# Altium PCB Acoustics Board.PcbDoc (part 3 of 3)
Units mil, origin at the board's own origin, x right, y up, seen from the top; angles counter-clockwise.
Board outline 4000 x 4000 mil, 4 copper layers (Top Layer, Middle 1 Layer, Middle 2 Layer, Bottom Layer), stack 53.912 mil thick; 197 components, 130 nets, 610 pads, 658 vias.
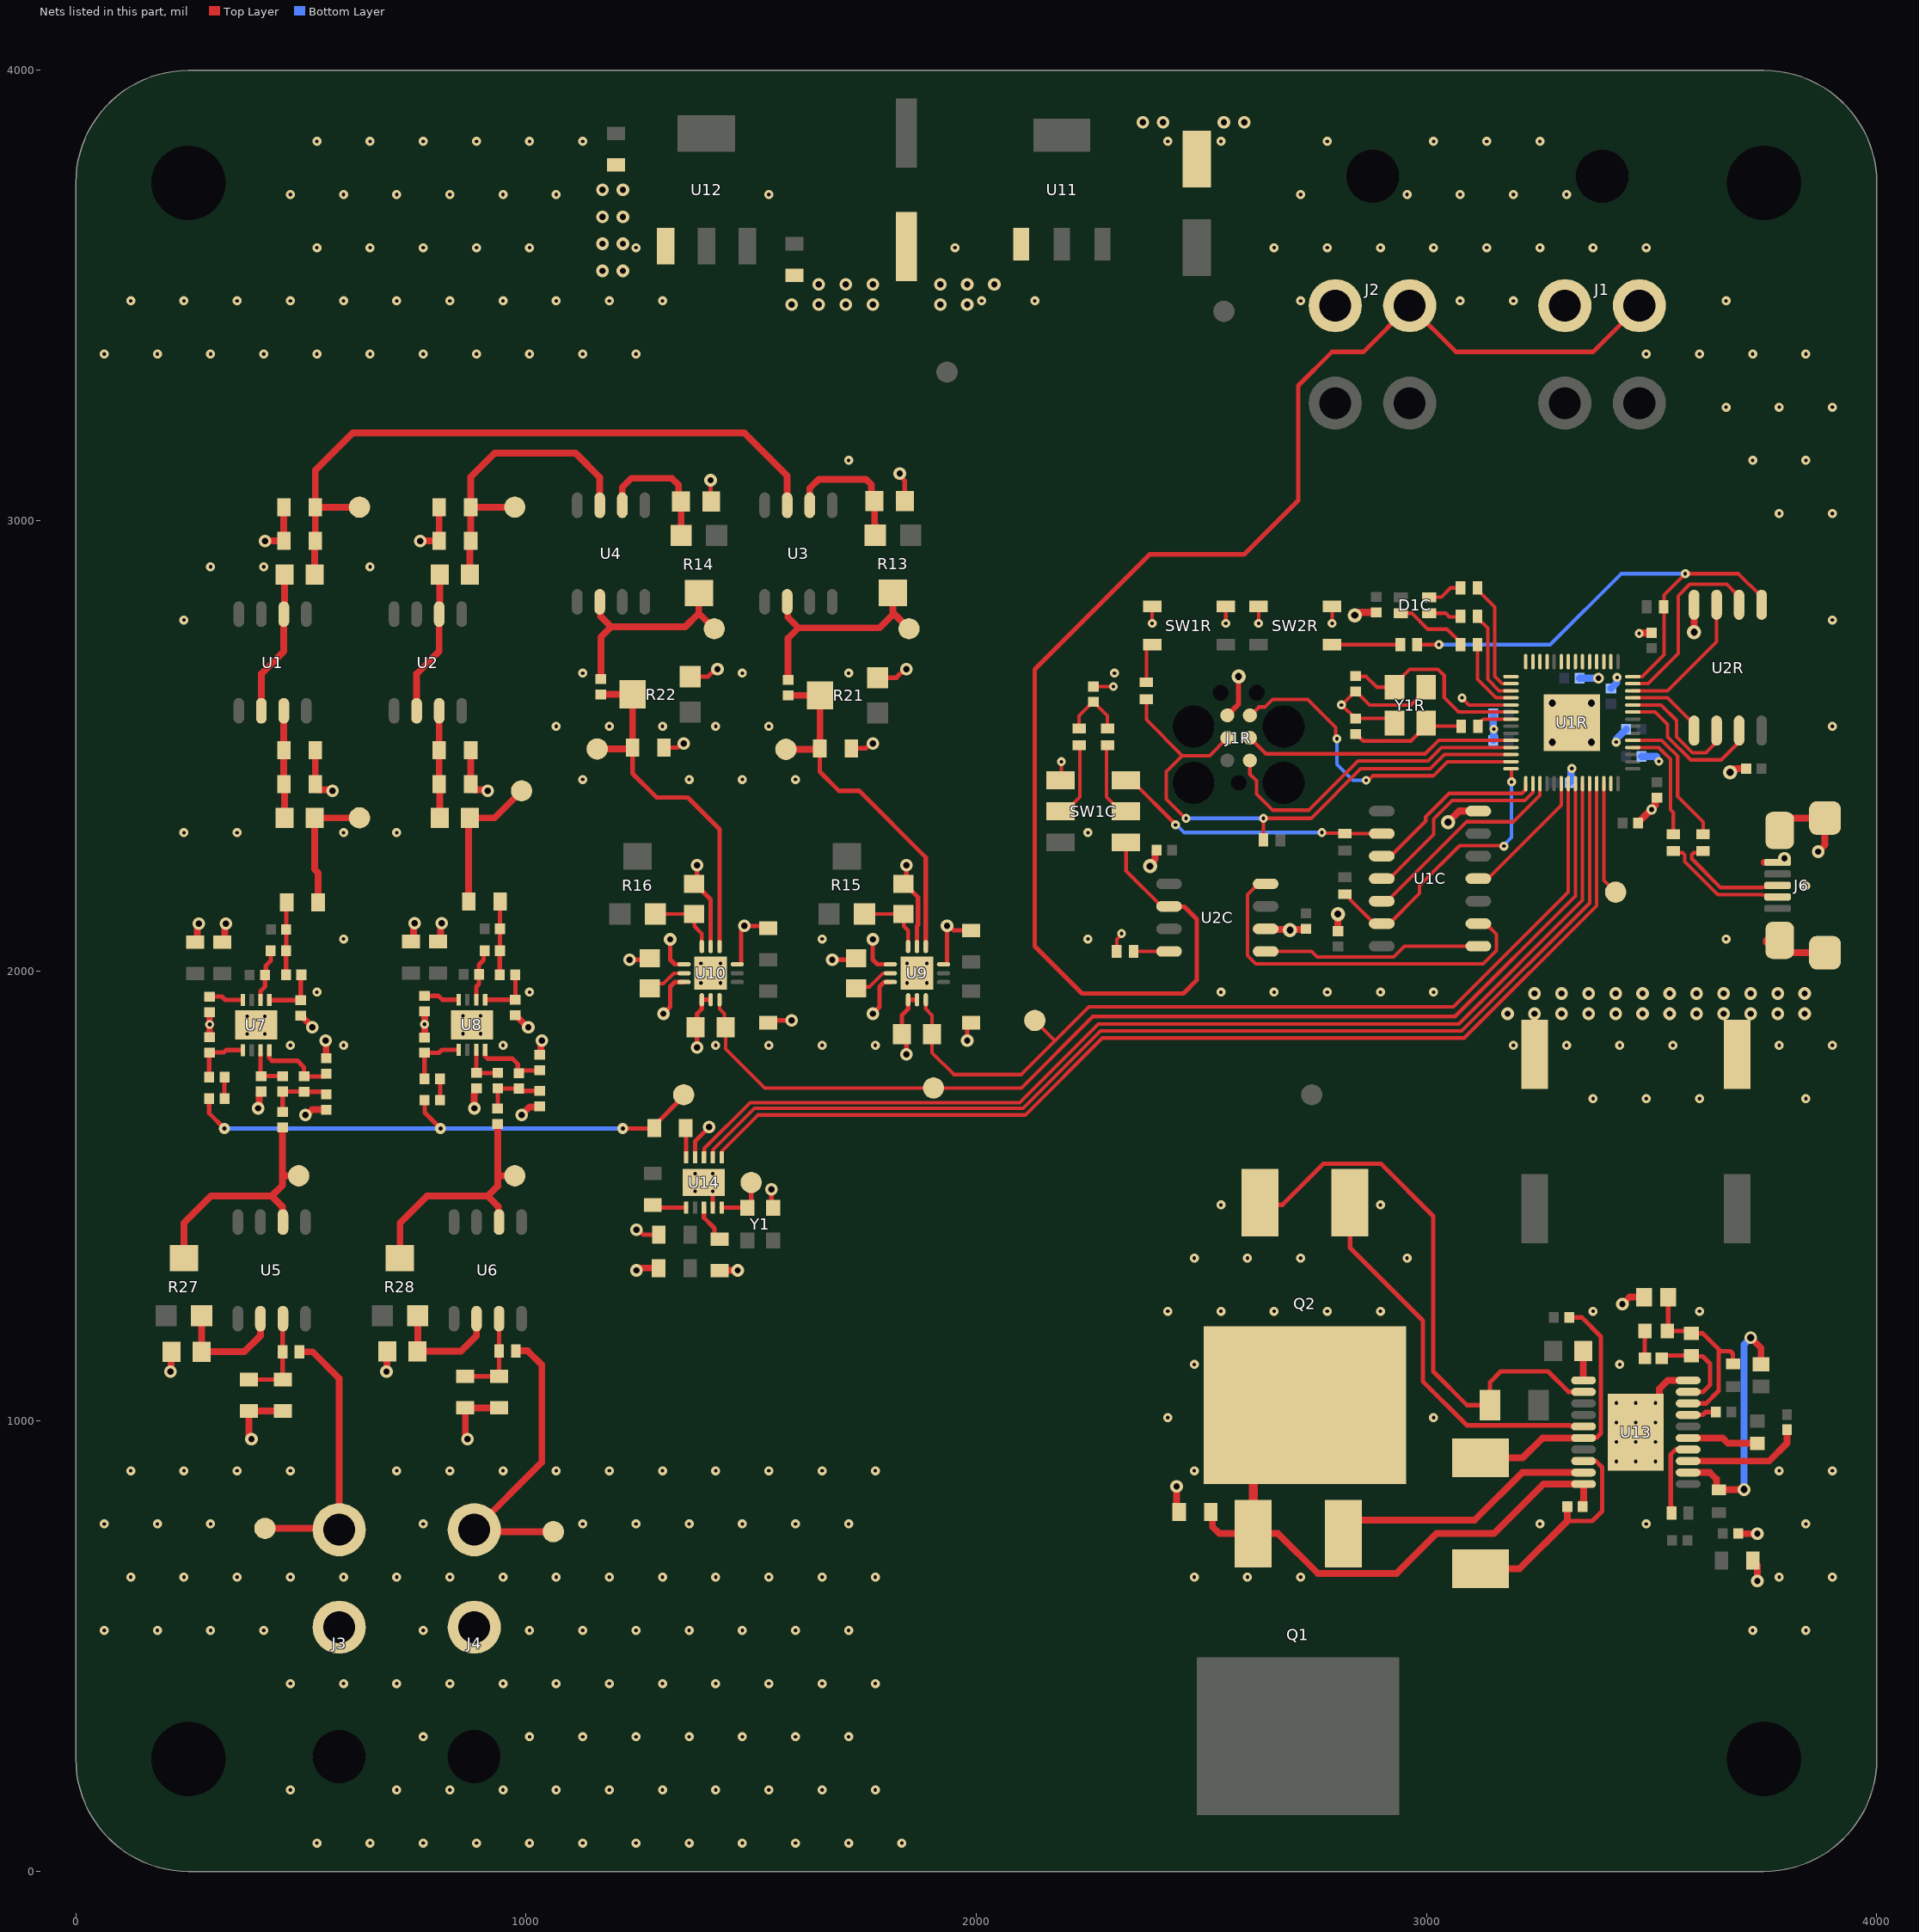
[diagram p4: the nets of this part, all layers, seen from the top]

## Via types
v1: diameter 28, hole 14, Top Layer to Bottom Layer, tented both sides, 299 vias
v2: diameter 20.08/20.08/20.08/20.08 (per signal layer), hole 8.07, Top Layer to Bottom Layer, tented both sides, 256 vias
v3: diameter 19.68, hole 7.87, Top Layer to Bottom Layer, tented both sides, 71 vias
v4: diameter 31.5, hole 15.75, Top Layer to Bottom Layer, tented both sides, 19 vias
v5: diameter 28, hole 16, Top Layer to Bottom Layer, tented both sides, 6 vias
v6: diameter 24, hole 10, Top Layer to Bottom Layer, tented both sides, 3 vias
v7: diameter 20, hole 9, Top Layer to Bottom Layer, tented both sides, 2 vias
v8: diameter 23.62, hole 11.81, Top Layer to Bottom Layer, tented both sides, 2 vias

## Nets (pads, with @x,y where several pads share a name; then routed paths per layer and width w, separated by ;. In a path a pad name is that pad's centre, name@x,y a point inside that pad or via, vN(x,y) a via of type N, cw(c..) or ccw(c..) an arc to the next point about the centre after c; other vN are vias at no path point) (continued)
CANL_RP2CAN: J1.2 J2.2 SW1C.1 U2C.6 | length 3354.6
  Top Layer w7.87: SW1C.1@2320.87,2285.71 SW1C.1@2332.68,2285.71
  Top Layer w8: SW1C.1@2332.68,2285.71 2332.68,2222.13 2411.42,2143.39 U2C.6@2428.15,2143.39
  Top Layer w10: U2C.6@2428.15,2143.39 2428.74,2142.79 2462.21,2142.79 2490,2115 2490,1980 2460,1950 2235,1950 2130,2055 2130,2670 2385,2925 2595,2925 2715,3045 2715,3300 2790,3375 2860.08,3375 J2.2@2962.68,3477.6 3065.28,3375 3370.08,3375 J1.2@3472.68,3477.6
CANRX_RP2CAN: U1C.2 U2C.4 | length 845.6
  Top Layer w7.87: U2C.4@2642.72,2193.39 2625.98,2193.39 2602.36,2169.76 2602.36,2033.6 2620.53,2015.43 3125.73,2015.43 3155.51,2045.22 3155.51,2081.38 3131.89,2105 U1C.2@3115.16,2105
CANTX_RP2CAN: U1C.1 U2C.1 | length 487.4
  Top Layer w7.87: U2C.1@2642.72,2043.39 2745.06,2043.39 2757.26,2031.18 2926.91,2031.18 2950.73,2055 U1C.1@3115.16,2055
"Comparator L": C27.1 D1.2 R21.2 TP9.TP U9.4 | length 832.2
  Top Layer w10: C27.1@1652.45,2494.38 1652.45,2442.55 1695,2400 1740,2400 1887.88,2252.12 U9.4@1887.88,2054.06
  Top Layer w15: TP9.TP@1575,2490 TP9.TP@1577.19,2492.19 1650.26,2492.19 C27.1@1652.45,2494.38 1652.45,2514.38 1652.91,2514.84 R21.2@1652.91,2612 1623.39,2612 1623.35,2611.96 D1.2@1582,2611.96
"Comparator R": C28.1 D2.2 R22.2 TP11.TP U10.4 | length 835
  Top Layer w10: C28.1@1236.39,2496.02 1236.39,2438.61 1290,2385 1359.47,2385 1429.68,2314.78 U10.4@1429.68,2054.06
  Top Layer w15: TP11.TP@1155,2490 TP11.TP@1158.01,2493.01 1233.38,2493.01 C28.1@1236.39,2496.02 ; D2.2@1166.24,2614.23 1207.03,2614.23 1207.08,2614.28 R22.2@1236.61,2614.28 C28.1@1236.6,2496.24
DBG_TX_RP2040: J1R.5 U1R.27 | length 732.1
  Top Layer w7.87: J1R.5@2607.68,2567.6 2609.17,2567.6 2627.74,2586.16 2640.77,2586.16 2657.64,2603.04 2735.82,2603.04 2798.03,2540.82 2798.03,2518.8 v3(2801.18,2515.65) ; v3(2866.14,2423.5) 2870.75,2423.5 2880.6,2433.35 3015.01,2433.35 3046.51,2464.84 U1R.27@3187.5,2464.84
  Bottom Layer w7.87: v3(2801.18,2515.65) 2801.18,2458.94 2836.61,2423.5 v3(2866.14,2423.5)
"Envelope Detector L": D1.1 R13.2 TP7.TP U3.6 | length 512.6
  Top Layer w15: U3.6@1580,2819.72 1581.27,2818.45 1581.27,2785.73 1605,2762 ; D1.1@1582,2646.21 1582,2739 1605,2762 ; R13.2@1815,2839.91 1815,2792 ; TP7.TP@1850.61,2760 1818.61,2792 1815,2792 ; 1605,2762 1785,2762 1815,2792
"Envelope Detector R": D2.1 R14.2 TP8.TP U4.6 | length 491.8
  Top Layer w15: U4.6@1163.69,2819.72 1165.34,2818.07 1165.34,2787.63 1188.69,2764.28 ; D2.1@1166.24,2648.48 1166.24,2741.83 1188.69,2764.28 ; R14.2@1383.69,2839.28 1383.69,2794.28 ; TP8.TP@1417.98,2760 1383.69,2794.28 ; 1188.69,2764.28 1353.69,2764.28 1383.69,2794.28
FSYNC: U1R.37 U14.8 | length 2458.5
  Top Layer w7.87: U14.8@1395,1585.71 1395.98,1586.69 1395.98,1605.98 1497.44,1707.44 2096.29,1707.44 2271.18,1882.33 3071.72,1882.33 3346.46,2157.06 U1R.37@3346.46,2416.12
GND: C1.2 C1C.2 C1R.2 C2.2 C2C.1 C2R.2 C3.2 C3C.2 C3R.2 C4.2 C4C.2 C4R.2 C5.2 C5C.2 C5R.2 C6.2 C6R.2 C7R.2 C8R.2 C9.1 C9R.2 C10.1 C10R.2 C11R.2 C12R.2 C13.1 C13R.2 C14.1 C15.1 C16.1 C17.1 C18.1 C19.1 C20.1 C21.2 C22.2 C27.2 C28.2 C29.1 C30.1 C31.2 C34.2 C35.2 C36.2 C37.2 C38.2 C39.2 C42.1 C43.1 C51.2 C52.2 C53.2 C54.2 J1.1 J1R.6 J2.1 J3.1 J4.1 J6.5 J6.6 J6.7 J6.8 J6.9 L1.2 L2.2 L3.2 L4.2 L5.2 L6.2 L9.2 L10.2 L11.2 L12.2 L21.1 R6C.2 R9.2 R10.2 R17.2 R18.2 R19.1 R20.1 R21.3 R22.3 R25.2 R26.2 R29.2 R30.2 R31.2 SW1C.6 SW1R.B1 SW1R.B2 SW2R.B1 SW2R.B2 U1C.7 U1R.19 U1R.57 U2C.2 U2R.4 U7.9 U8.9 U9.3 U9.5 U9.7 U9.9 U9.10 U9.11 U9.13 U10.3 U10.5 U10.7 U10.9 U10.10 U10.11 U10.13 U11.1 U12.1 U13.10 U13.21 U14.4 U14.9 U14.11 Y1.2 Y1R.2 Y1R.4 | length 5947.9
  Top Layer w7.87: SW1C.6@2187.01,2423.5 2188.98,2425.47 v3(2188.98,2464.84) ; C2C.1@2259.84,2631.57 v3(2304.44,2631.57) ; R6C.2@2312.01,2043.39 2312.01,2069.96 2322.83,2080.79 v3(2322.83,2082.95) ; v3(2390.75,2771.93) SW1R.B2@2390.75,2809.33 ; v3(2554.13,2771.93) 2554.13,2805.47 SW1R.B1@2554.25,2805.59 ; v3(2626.97,2771.93) SW2R.B2@2626.97,2809.33 ; v3(2790.35,2771.93) SW2R.B1@2790.35,2809.33 ; v3(3078.74,2606.57) 3094.49,2590.83 U1R.19@3187.5,2590.83 ; U1R.57@3275.59,2590.83 v4(3279.53,2594.76)
  Top Layer w8: SW1R.B1@2551.57,2808.27 SW1R.B1@2554.25,2805.59 ; v3(2811.02,2590.83) v3@2811.61,2590.83 ; Y1R.2@2929.13,2550.2 2918.62,2560.71 C2R.2@2842.52,2560.71 2841.73,2560.71 v3@2811.61,2590.83 ; Y1R.4@2999.13,2630.2 2999.13,2624.29 2965.61,2590.76 2873.49,2590.76 2843.31,2620.94 C1R.2@2842.52,2620.94 2841.73,2620.94 v3@2811.61,2590.83
  Top Layer w10: v1(1230,2025) 1271.5,2025 R20.1@1275,2028.5 ; v1(1245,1425) 1249.87,1425 1260.58,1414.29 C31.2@1294.68,1414.29 ; v1(1305,1905) 1320,1920 1320,1965 1330.32,1975.32 U10.9@1350.94,1975.32 ; C28.2@1306.39,2496.02 1336.14,2496.02 1345.13,2505 v1(1350,2505) ; v1(1320,2070) 1320,2025 1330.31,2014.69 U10.7@1350.94,2014.69 ; R22.3@1364.56,2653.65 1403.78,2653.65 1420.13,2670 v1(1425,2670) ; U14.9@1375.31,1585.71 1375.31,1621.82 v1(1406.75,1653.25) ; v1(1380,1830) 1380,1871.5 R18.2@1376.5,1875 1379.81,1878.31 1379.81,1904.81 1390.31,1915.31 U10.10@1390.31,1935.94 U10.11@1410,1935.94 ; v1(1380,2235) 1380,2200.3 R30.2@1373.2,2193.5 1375.7,2193.5 1410,2159.2 U10.5@1410,2054.06 ; v1(1410,3090) 1410,3043.98 R10.2@1411.35,3042.63 ; U14.4@1414.68,1474.29 v3(1414.68,1510.31) ; U10.3@1469.06,2014.69 1477.83,2014.69 1477.91,2014.76 1477.91,2088.04 1485,2095.13 v1(1485,2100) 1533.2,2100 C52.2@1538.2,2095 ; C54.2@1538.2,1885 1543.2,1890 v1(1590,1890) ; v1(1545,1515) 1545,1477.53 Y1.2@1548.34,1474.2 ; v1(1680,2025) 1729.7,2025 R19.1@1733.2,2028.5 ; C27.2@1722.45,2494.38 1754.51,2494.38 1765.13,2505 v1(1770,2505) ; v1(1770,1905) 1785,1920 1785,1965 1795.32,1975.32 U9.9@1809.14,1975.32 ; v1(1770,2070) 1770,2025 1780.31,2014.69 U9.7@1809.14,2014.69 ; R21.3@1780.87,2651.37 1822.62,2651.37 1841.25,2670 v1(1845,2670) ; v1(1830,3105) 1830,3100.13 1841.03,3089.1 R9.2@1841.03,3043.49 ; v1(1845,1815) 1845,1849.7 R17.2@1834.7,1860 1834.7,1901.5 1848.51,1915.31 U9.10@1848.51,1935.94 U9.11@1868.2,1935.94 ; v1(1845,2235) 1845,2200.3 R29.2@1838.2,2193.5 1840.7,2193.5 1870.7,2163.5 1870.7,2102.36 1868.2,2099.86 U9.5@1868.2,2054.06 ; U9.3@1927.25,2014.69 1934.92,2014.69 1935,2014.76 v1(1935,2100) 1939.87,2100 1949.87,2090 C51.2@1988.2,2090 ; v1(1980,1845) 1980,1876.8 C53.2@1988.2,1885 ; L21.1@2445,804.32 L21.1@2450.74,798.58 ; J6.7@3780,2310 3782.56,2310 J6.7@3784.61,2312.05
  Top Layer w11.81: J1R.6@2557.68,2567.6 2582.59,2592.51 v4(2582.59,2654.14)
  Top Layer w15: v1(210,1110) 211.27,1111.27 211.27,1153.1 R25.2@212.54,1154.37 ; C17.1@264.98,2064.21 269.89,2069.12 269.89,2098.6 272.86,2101.56 v1(272.86,2105.08) ; C13.1@296.69,1852.96 297.07,1853.35 297.07,1880.72 v7(297.46,1881.1) 297.07,1881.49 297.07,1908.32 C15.1@296.69,1908.71 ; C19.1@325.26,2063.98 330.65,2069.36 330.65,2102.36 v1(333.14,2104.85) ; v1(390,960) 390,963.52 384.41,969.11 C5.2@384.41,1022.58 L5.2@459.41,1022.58 ; v1(405,1695) 405,1698.52 407.6,1701.11 407.6,1728.59 411.12,1732.11 C9.1@411.91,1732.11 ; v1(420,2955) L3.2@462,2955 C3.2@462,3030 ; C21.2@499.44,1900.59 500.23,1900.59 525,1875.82 v1(525,1875) ; v1(510,1680) 512.96,1680 524.79,1691.83 L9.2@556.37,1691.83 ; C1.2@532,2490 L1.2@532,2415 532,2410 539.5,2402.5 563.98,2402.5 566.48,2400 v1(570,2400) ; v1(555,1845) 555.69,1844.31 555.69,1806.47 L11.2@556.39,1805.78 ; v1(690,1110) 690.92,1110.92 690.92,1154.41 R26.2@691.83,1155.32 ; C18.1@744.58,2065.26 749.97,2070.65 749.97,2103.64 v1(752.46,2106.13) ; v1(765,2955) L4.2@807,2955 C4.2@807,3030 ; C14.1@774.58,1852.39 v7(774.59,1881.42) C16.1@774.58,1910.26 ; C20.1@804.58,2065.26 809.97,2070.65 809.97,2103.64 v1(812.46,2106.13) ; v1(870,960) 870,963.52 865.04,968.48 C6.2@865.04,1029.62 L6.2@940.04,1029.62 ; L2.2@877,2490 C2.2@877,2415 877,2410 884.5,2402.5 908.98,2402.5 911.48,2400 v1(915,2400) ; v1(885,1695) 885,1726.82 885.35,1727.17 885.35,1735.61 888.87,1739.14 C10.1@889.66,1739.14 ; C22.2@976.2,1901.67 976.98,1901.67 1003.65,1875 v1(1005,1875) ; v1(990,1680) 1007.61,1697.61 1028.7,1697.61 L10.2@1030.48,1699.4 ; L12.2@1030.64,1813.99 1032.82,1816.17 1032.82,1842.82 v1(1035,1845) ; v1(1245,1335) 1248.52,1335 1253.61,1340.09 C29.1@1294.49,1340.09 ; C30.1@1429.68,1334.29 1430.04,1334.65 1469.65,1334.65 v1(1470,1335) ; L21.1@2445,804.32 v1(2445,855) ; v1(3435,1260) 3435.16,1260 3450.67,1275.51 R31.2@3483.39,1275.51 ; U13.21@3508.27,1042.44 v3(3508.27,1040.47) 3517.47,1049.67 3517.47,1072.47 3535.67,1090.67 U13.10@3581.1,1090.67 ; C39.2@3692.09,750.51 3692.34,750.26 3734.74,750.26 v1(3735,750) ; C38.2@3724.96,690.51 3734.96,680.51 3734.96,669.69 3735,669.65 v1(3735,645) ; 3749.69,2241.18 3750.06,2241.56 3783.04,2241.56 3791.48,2250 v1(3795,2250) ; J6.6@3754.61,2067.95 3754.61,2063.76 3777.97,2040.39 J6.9@3855,2040.39 ; J6.7@3807.97,2339.61 J6.8@3885,2339.61 3885,2280 v1(3870,2265)
  Top Layer w15.75: v4(2385.83,2232.56) 2385.83,2236.82 2397.05,2248.04 2397.05,2264.06 2400.2,2267.2 C3C.2@2400.2,2267.99 ; U2C.2@2642.72,2093.39 2644,2092.11 2695.57,2092.11 v4(2696.85,2090.83) 2698.13,2092.11 2731,2092.11 C4C.2@2732.28,2093.39 ; C1C.2@2803.15,2088.27 v4(2803.15,2126.26) ; v4(2840.87,2789.96) 2845.13,2789.96 2851.63,2796.46 C5C.2@2888.11,2796.46 ; v4(3047.77,2330.46) 3072.32,2355 U1C.7@3115.16,2355 ; C10R.2@3469.28,2328.89 3498.93,2358.54 v8(3500,2358.54) 3500,2359.61 3507.87,2367.48 3507.87,2381.57 3511.02,2384.72 C4R.2@3511.81,2384.72 ; v3(3472.44,2749.55) 3473.13,2750.24 3499.31,2750.24 C7R.2@3500,2750.93 ; U2R.4@3594.29,2813.32 3594.39,2813.23 3594.39,2752.34 v4(3594.49,2752.24) ; v4(3674.41,2441.22) 3682.28,2449.09 C3R.2@3707.28,2449.09
  Bottom Layer w15.75: C12R.2@3148.23,2512.09 3148.92,2512.78 3148.92,2536.26 v3(3149.61,2536.95) 3149.61,2538.02 3148.23,2539.39 C8R.2@3148.23,2571.25 ; C9R.2@3317.72,2417.6 3320.87,2420.75 3320.87,2446.55 3322.83,2448.52 v3(3322.83,2449.58) ; C6R.2@3339.96,2649.88 3340.14,2650.06 3381.9,2650.06 v8(3382.08,2650.25) ; C13R.2@3409.45,2627.64 3410.24,2627.64 3422.56,2639.96 3422.56,2651.18 v3(3423.31,2651.93) ; v3(3421.26,2508.15) 3422.01,2508.9 3422.01,2515.46 3439.57,2533.01 3440.35,2533.01 3443.5,2536.16 C5R.2@3443.5,2536.95 ; C11R.2@3477.76,2476.65 3510.75,2476.65 3510.75,2471.78 3516.18,2466.34 v3(3516.18,2465.28)
  other v1: 3180,1905 3240,1905 3300,1905 3360,1905 3420,1905 3480,1905 3540,1905 3600,1905 3660,1905 3720,1905 3780,1905 3840,1905 3240,1950 3300,1950 3360,1950 3420,1950 3480,1950 3540,1950 3600,1950 3660,1950 3720,1950 3780,1950 3840,1950 1590,3480 1650,3480 1710,3480 1770,3480 1920,3480 1980,3480 1650,3525 1710,3525 1770,3525 1920,3525 1980,3525 2040,3525 1170,3555 1215,3555 1170,3615 1215,3615 1170,3675 1215,3675 1170,3735 1215,3735 2370,3885 2415,3885 2550,3885 2595,3885
  other v2: 535.43,62.99 653.54,62.99 771.65,62.99 889.76,62.99 1007.87,62.99 1125.98,62.99 1244.09,62.99 1362.2,62.99 1480.31,62.99 1598.42,62.99 1716.53,62.99 1834.64,62.99 476.38,181.1 712.6,181.1 830.71,181.1 948.82,181.1 1066.93,181.1 1185.04,181.1 1303.15,181.1 1421.26,181.1 1539.37,181.1 1657.48,181.1 1775.59,181.1 771.65,299.21 1007.87,299.21 1125.98,299.21 1244.09,299.21 1362.2,299.21 1480.31,299.21 1598.42,299.21 1716.53,299.21 476.38,417.32 594.49,417.32 712.6,417.32 830.71,417.32 948.82,417.32 1066.93,417.32 1185.04,417.32 1303.15,417.32 1421.26,417.32 1539.37,417.32 1657.48,417.32 1775.59,417.32 62.99,535.43 181.1,535.43 299.21,535.43 417.32,535.43 771.65,535.43 1007.87,535.43 1125.98,535.43 1244.09,535.43 1362.2,535.43 1480.31,535.43 1598.42,535.43 1716.53,535.43 3724.41,535.43 3842.52,535.43 122.05,653.54 240.16,653.54 358.27,653.54 476.38,653.54 594.49,653.54 712.6,653.54 830.71,653.54 948.82,653.54 1066.93,653.54 1185.04,653.54 1303.15,653.54 1421.26,653.54 1539.37,653.54 1657.48,653.54 1775.59,653.54 2484.25,653.54 2602.36,653.54 2720.47,653.54 3783.46,653.54 3901.57,653.54 62.99,771.65 181.1,771.65 299.21,771.65 771.65,771.65 1125.98,771.65 1244.09,771.65 1362.2,771.65 1480.31,771.65 1598.42,771.65 1716.53,771.65 3251.97,771.65 3488.19,771.65 3842.52,771.65 122.05,889.76 240.16,889.76 358.27,889.76 476.38,889.76 712.6,889.76 830.71,889.76 948.82,889.76 1066.93,889.76 1185.04,889.76 1303.15,889.76 1421.26,889.76 1539.37,889.76 1657.48,889.76 1775.59,889.76 2484.25,889.76 3783.46,889.76 3901.57,889.76 2425.2,1007.87 3015.75,1007.87 2484.25,1125.98 3429.13,1125.98 2425.2,1244.09 2543.31,1244.09 2661.42,1244.09 2779.53,1244.09 2897.64,1244.09 3370.08,1244.09 3606.3,1244.09 2484.25,1362.2 2602.36,1362.2 2720.47,1362.2 2956.69,1362.2 2543.31,1480.31 2897.64,1480.31 3370.08,1716.53 3488.19,1716.53 3606.3,1716.53 3842.52,1716.53 476.38,1834.64 594.49,1834.64 948.82,1834.64 1421.26,1834.64 1539.37,1834.64 1657.48,1834.64 1775.59,1834.64 3192.91,1834.64 3311.02,1834.64 3429.13,1834.64 3547.24,1834.64 3783.46,1834.64 3901.57,1834.64 535.43,1952.76 1007.87,1952.76 2543.31,1952.76 2661.42,1952.76 2779.53,1952.76 2897.64,1952.76 3015.75,1952.76 594.49,2070.87 1657.48,2070.87 2248.03,2070.87 3665.35,2070.87 3842.52,2188.98 240.16,2307.09 358.27,2307.09 594.49,2307.09 712.6,2307.09 2248.03,2307.09 1125.98,2425.2 1362.2,2425.2 1480.31,2425.2 1598.42,2425.2 1066.93,2543.31 1185.04,2543.31 1303.15,2543.31 1421.26,2543.31 1539.37,2543.31 3901.57,2543.31 1125.98,2661.42 1480.31,2661.42 1716.53,2661.42 2307.09,2661.42 240.16,2779.53 3901.57,2779.53 299.21,2897.64 417.32,2897.64 653.54,2897.64 3783.46,3015.75 3901.57,3015.75 1716.53,3133.86 3724.41,3133.86 3842.52,3133.86 3665.35,3251.97 3783.46,3251.97 3901.57,3251.97 62.99,3370.08 181.1,3370.08 299.21,3370.08 417.32,3370.08 535.43,3370.08 653.54,3370.08 771.65,3370.08 889.76,3370.08 1007.87,3370.08 1125.98,3370.08 1244.09,3370.08 3488.19,3370.08 3606.3,3370.08 3724.41,3370.08 3842.52,3370.08 122.05,3488.19 240.16,3488.19 358.27,3488.19 476.38,3488.19 594.49,3488.19 712.6,3488.19 830.71,3488.19 948.82,3488.19 1066.93,3488.19 1185.04,3488.19 1303.15,3488.19 2011.81,3488.19 2129.92,3488.19 2720.47,3488.19 3074.8,3488.19 3192.91,3488.19 3665.35,3488.19 535.43,3606.3 653.54,3606.3 771.65,3606.3 889.76,3606.3 1007.87,3606.3 1244.09,3606.3 1952.76,3606.3 2661.42,3606.3 2779.53,3606.3 2897.64,3606.3 3015.75,3606.3 3133.86,3606.3 3251.97,3606.3 3370.08,3606.3 3488.19,3606.3 476.38,3724.41 594.49,3724.41 712.6,3724.41 830.71,3724.41 948.82,3724.41 1066.93,3724.41 1539.37,3724.41 2720.47,3724.41 2956.69,3724.41 3074.8,3724.41 3192.91,3724.41 3311.02,3724.41 535.43,3842.52 653.54,3842.52 771.65,3842.52 889.76,3842.52 1007.87,3842.52 1125.98,3842.52 2425.2,3842.52 2543.31,3842.52 2779.53,3842.52 3015.75,3842.52 3133.86,3842.52 3251.97,3842.52
  other v3: 3421.65,910.55 3464.96,910.55 3508.27,910.55 3421.65,953.86 3464.96,953.86 3508.27,953.86 3421.65,997.17 3464.96,997.17 3508.27,997.17 3421.65,1040.47 3464.96,1040.47 1375.31,1510.31 1375.31,1549.68 1414.68,1549.68 380.63,1860 420,1860 859.9,1860.58 899.27,1860.58 380.63,1899.37 420,1899.37 859.9,1899.95 899.27,1899.95 1388.35,1973.35 1431.65,1973.35 1846.54,1973.35 1889.85,1973.35 1388.35,2016.65 1431.65,2016.65 1846.54,2016.65 1889.85,2016.65
  other v4: 3279.53,2508.15 3366.14,2508.15 3366.14,2594.76
"Hydrophone L": J3.2 R23.2 TP15.TP | length 614.9
  Top Layer w15: TP15.TP@420,761.97 581.97,761.97 J3.2@585,758.94 585,1095 526.1,1153.9 R23.2@496.86,1153.9
"Hydrophone R": J4.2 R24.2 TP17.TP | length 682.4
  Top Layer w15: R24.2@977.37,1156.12 1003.88,1156.12 1035,1125 1035,908.94 J4.2@885,758.94 889.47,754.47 TP17.TP@1060.53,754.47 TP17.TP@1065,750
INT_RP2CAN: U1C.4 U1R.34 | length 297.2
  Top Layer w7.87: U1C.4@3115.16,2205 3136.15,2205 3299.21,2368.06 U1R.34@3299.21,2413.66
LEDB_RP2CAN: R8C.1 U1R.18 | length 168.1
  Top Layer w7.87: R8C.1@3113.19,2724.68 3113.19,2648.03 3154.64,2606.57 U1R.18@3187.5,2606.57
LEDG_RP2CAN: R7C.1 U1R.17 | length 211.6
  Top Layer w7.87: R7C.1@3113.19,2787.68 3113.19,2783.74 3135.83,2761.1 3135.83,2647.66 3161.17,2622.32 U1R.17@3187.5,2622.32
LEDR_RP2CAN: R5C.1 U1R.16 | length 255
  Top Layer w7.87: R5C.1@3113.19,2850.67 3113.19,2846.73 3151.57,2808.35 3151.57,2654.19 3167.69,2638.07 U1R.16@3187.5,2638.07
"Local Oscillator": C33.2 C49.1 C50.1 TP13.TP | length 1214.4
  Top Layer w10: C49.1@295.94,1716.69 295.94,1684.06 v6(330,1650) ; C50.1@774.87,1713.05 774.87,1685.13 v6(810,1650) ; v6(1215,1650) 1283.47,1650 C33.2@1284.67,1651.2 1284.67,1656.2 1350,1721.53 TP13.TP@1350,1725
  Bottom Layer w10: v6(330,1650) v6(810,1650) v6(1215,1650)
MCLK: TP14.TP U14.5 Y1.3 | length 116.3
  Top Layer w10: U14.5@1434.37,1474.29 1475.41,1474.29 1475.5,1474.2 Y1.3@1491.25,1474.2 1500,1482.94 TP14.TP@1500,1530
MISO_RP2CAN: U1C.12 U1R.31 | length 475
  Top Layer w7.87: U1C.12@2900.59,2155 2913.06,2155 3089.44,2331.38 3193.56,2331.38 3251.97,2389.79 U1R.31@3251.97,2416.12
"Mixer L": C7.1 R27.2 TP2.TP U5.6 | length 564.1
  Top Layer w15: R27.2@240,1362.09 240,1440 300,1500 435,1500 ; C7.1@459.16,1652.39 459.16,1545 ; U5.6@460,1442.28 458.73,1443.55 458.73,1476.27 435,1500 ; TP2.TP@495,1545 459.16,1545 ; 435,1500 459.16,1524.16 459.16,1545
"Mixer R": C8.1 R28.2 TP5.TP U6.6 | length 573
  Top Layer w15: R28.2@720,1362.09 720,1440 780,1500 915,1500 ; C8.1@936.94,1659.98 936.94,1545 ; U6.6@940,1442.28 938.73,1443.55 938.73,1476.27 915,1500 ; TP5.TP@975,1545 936.94,1545 ; 915,1500 936.94,1521.94 936.94,1545
MOSI_RP2CAN: U1C.11 U1R.30 | length 454.6
  Top Layer w7.87: U1C.11@2900.59,2205 2917.32,2205 3015.75,2303.43 3015.75,2337.4 3056.97,2378.62 3218.53,2378.62 3236.22,2396.31 U1R.30@3236.22,2416.12
nCS_RP2CAN: R4C.2 U1C.13 U1R.28 | length 646.2
  Top Layer w7.87: R4C.2@2818.9,2170.55 2822.83,2170.55 2829.72,2163.66 2829.72,2159.13 2883.86,2105 U1C.13@2900.59,2105 2917.32,2105 2984.51,2172.19 2984.51,2189.51 3073.62,2278.62 3170.47,2278.62 v3(3172.03,2277.07) ; U1R.28@3187.5,2449.09 3188.98,2449.09 v3(3188.98,2419.96)
  Bottom Layer w7.87: v3(3172.03,2277.07) 3172.03,2279.36 3188.98,2296.31 v3(3188.98,2419.96)
NetC1_1: C1.1 L1.1 R1.1 U1.3 | length 238.3
  Top Layer w15: U1.3@462,2577.72 C1.1@462,2490 L1.1@462,2415 463.5,2413.5 R1.1@463.5,2340
NetC2_1: C2.1 L2.1 R2.1 U2.3 | length 238.3
  Top Layer w15: U2.3@807,2577.72 L2.1@807,2490 C2.1@807,2415 808.5,2413.5 R2.1@808.5,2340
NetC2C_2: C2C.2 R2C.2 R3C.2 | length 144.3
  Top Layer w7.87: R3C.2@2228.35,2538.66 2228.35,2566.61 2259.06,2597.32 C2C.2@2259.84,2597.32 2260.63,2597.32 2291.34,2566.61 R2C.2@2291.34,2538.66
NetC2R_1: C2R.1 R1R.2 Y1R.3 | length 263.4
  Top Layer w8: C2R.1@2842.52,2526.46 2843.31,2526.46 2859,2510.76 2965.61,2510.76 2999.13,2544.29 Y1R.3@2999.13,2550.2 3005.75,2543.58 R1R.2@3076.85,2543.58
NetC5_1: C5.1 L5.1 R23.1 U5.3 | length 210.4
  Top Layer w10: C5.1@384.41,1092.58 L5.1@459.41,1092.58 459.41,1139.09 459.46,1139.14 R23.1@459.46,1153.9 459.46,1198.63 460,1199.17 U5.3@460,1227.72
NetC6_1: C6.1 L6.1 R24.1 U6.3 | length 203
  Top Layer w10: C6.1@865.04,1099.62 L6.1@940.04,1099.62 R24.1@939.96,1156.12 ; R24.1@940,1156.16 U6.3@940,1227.72
NetC7_2: C7.2 C11.2 L7.2 L9.1 | length 144.8
  Top Layer w10: C7.2@459.16,1686.65 459.16,1720.66 459.58,1721.08 L7.2@459.58,1732.11 ; L7.2@459.85,1732.37 506.48,1732.37 C11.2@507.34,1731.51 550.95,1731.51 L9.1@556.37,1726.08
NetC8_2: C8.2 C12.2 L8.2 L10.1 | length 140.5
  Top Layer w10: C8.2@936.94,1694.23 937.03,1694.32 937.03,1738.93 L8.2@937.12,1739.02 948.93,1739.02 949.11,1738.84 C12.2@983.92,1738.84 989.11,1733.65 L10.1@1030.48,1733.65
NetC9_2: C9.2 L7.1 U7.3 | length 97.7
  Top Layer w10: U7.3@410.26,1815.66 410.26,1768.01 C9.2@411.91,1766.36 423.72,1766.36 L7.1@459.58,1766.36
NetC10_2: C10.2 L8.1 U8.3 | length 98.8
  Top Layer w10: U8.3@889.43,1824.55 889.43,1784.64 889.66,1784.41 C10.2@889.66,1773.39 901.47,1773.39 901.59,1773.27 L8.1@937.12,1773.27
NetC11_1: C11.1 L11.1 U7.4 | length 174.8
  Top Layer w10: U7.4@429.84,1823.98 429.84,1806.44 435.7,1800.58 492.16,1800.58 506.81,1785.93 506.81,1766.29 C11.1@507.34,1765.76 550.62,1765.76 L11.1@556.39,1771.53
NetC12_1: C12.1 L12.1 U8.4 | length 163.9
  Top Layer w10: U8.4@909.11,1824.55 909.11,1811.12 914.97,1805.26 969.58,1805.26 981.59,1793.26 981.59,1775.43 C12.1@983.92,1773.09 989.9,1779.07 1029.97,1779.07 L12.1@1030.64,1779.74
NetC13_2: C13.2 L13.2 U7.1 | length 128.6
  Top Layer w10: L13.2@296.02,1763.79 296.02,1807.01 296.69,1807.68 C13.2@296.69,1818.71 ; C13.2@296.96,1818.98 328.43,1818.98 333.7,1824.25 U7.1@368.21,1824.25
NetC14_2: C14.2 L14.2 U8.1 | length 135.5
  Top Layer w10: L14.2@774.58,1760.8 C14.2@774.58,1818.13 806.52,1818.13 812.93,1824.55 U8.1@850.06,1824.55
NetC15_2: C15.2 U7.8 | length 77.2
  Top Layer w10: C15.2@296.69,1942.96 324.54,1942.96 332.11,1935.39 U7.8@370.79,1935.39
NetC16_2: C16.2 U8.8 | length 79
  Top Layer w10: C16.2@774.58,1944.51 805.49,1944.51 814.03,1935.97 U8.8@850.06,1935.97
NetC21_1: C21.1 L17.2 U7.5 | length 126.7
  Top Layer w10: U7.5@429.84,1935.39 434.76,1935.39 435.32,1934.84 C21.1@499.44,1934.84 499.44,1977.91 500.85,1979.31 L17.2@500.85,1991.12
NetC22_1: C22.1 L18.2 U8.5 | length 122.4
  Top Layer w10: U8.5@909.11,1935.97 964.34,1935.97 964.38,1935.92 C22.1@976.2,1935.92 L18.2@976.2,1991.25
NetC23_1: C23.1 C25.2 L17.1 L19.2 | length 162
  Top Layer w10: L17.1@466.59,1991.12 466.59,2002.93 467.1,2003.44 C23.1@467.1,2044.78 467.1,2056.59 467.39,2056.88 L19.2@467.39,2092.18 467.39,2151.57 C25.2@468.22,2152.4
NetC23_2: C23.2 L15.2 U7.6 | length 118.8
  Top Layer w10: U7.6@410.16,1935.39 410.16,1955.16 420.08,1965.08 L15.2@420.08,1991.02 421.97,1992.91 421.97,2011.97 432.85,2022.85 C23.2@432.85,2044.78
NetC24_1: C24.1 C26.2 L18.1 L20.2 | length 161.5
  Top Layer w10: L18.1@941.54,1991.65 C24.1@941.54,2044.74 ; C24.1@941.99,2045.18 941.99,2081.65 ; L20.2@942.02,2081.68 L20.2@942.02,2093.49 C26.2@942.02,2153.55
NetC24_2: C24.2 L16.2 U8.6 | length 116.8
  Top Layer w10: U8.6@889.43,1935.97 889.43,1965.1 895.41,1971.09 L16.2@895.41,1992.6 895.41,2013.75 905.9,2024.23 905.9,2043.35 C24.2@907.74,2045.18
NetC30_2: C30.2 U14.3 | length 85
  Top Layer w10: U14.3@1395,1474.29 1395,1452.02 1418.59,1428.43 1418.59,1414.29 1428.59,1404.29 C30.2@1429.68,1404.29
NetC32_2: C32.2 U14.1 | length 76.6
  Top Layer w10: C32.2@1281.42,1480.12 1287.26,1474.29 U14.1@1355.63,1474.29
NetC33_1: C33.1 U14.10 | length 65.9
  Top Layer w10: C33.1@1354.67,1651.2 1355.63,1650.24 U14.10@1355.63,1585.71
NetC41_1: C41.1 L21.2 Q1.2 Q2.3 U13.20 | length 1367
  Top Layer w15: L21.2@2520.74,798.58 2524.65,794.67 2524.65,765.66 2539.8,750.51 Q1.2@2614.96,750.51 ; Q1.2@2614.96,784.51 Q1.2@2614.96,750.51 ; Q2.3@2614.96,920.51 Q2.3@2729.96,1035.51 ; C41.1@3347.09,810.51 3347.09,822.32 3348.82,824.06 U13.20@3348.82,860.35 3259.8,860.35 3149.96,750.51 3022.19,750.51 2933.69,662.01 2758.46,662.01 2669.96,750.51 Q1.2@2614.96,750.51
  Top Layer w20: Q1.2@2614.96,784.51 Q2.3@2614.96,920.51
NetC41_2: C41.2 D3.2 U13.18 | length 499.7
  Top Layer w10: 3312.83,778.39 3368.38,778.39 3389.96,799.96 3389.96,897.95 3376.38,911.54 U13.18@3348.82,911.54
  Top Layer w15: D3.2@3119.96,672.51 3206.96,672.51 3312.83,778.39 C41.2@3312.83,810.51
NetC44_1: C44.1 U13.7 | length 64.5
  Top Layer w10: U13.7@3581.1,1013.9 3581.2,1014 3613.45,1014 3619.96,1020.51 C44.1@3642.83,1020.51
NetC45_1: C45.1 U13.5 | length 158.8
  Top Layer w15: U13.5@3581.1,962.72 3657.76,962.72 3669.65,950.83 C45.1@3734.96,950.83
NetC46_1: C46.1 R7.2 U13.9 | length 220.1
  Top Layer w10: R7.2@3522.32,1139.84 3528.26,1145.78 C46.1@3587.91,1145.78 3589.64,1144.05 3613.78,1144.05 3629.96,1127.87 3629.96,1080.51 3614.53,1065.08 U13.9@3581.1,1065.08
NetC46_2: C46.2 C47.2 R31.1 R32.1 U13.8 | length 436.6
  Top Layer w10: R31.1@3536.54,1275.51 3536.54,1202.4 C47.2@3534.65,1200.51 3582.39,1200.51 C46.2@3587.91,1194.99 ; U13.8@3581.1,1039.49 3621.03,1039.49 3649.09,1067.55 3649.09,1159.65 ; C46.2@3587.91,1194.99 3613.78,1194.96 3649.09,1159.65 ; R32.1@3680.58,1127.59 3680.58,1149.65 3674.72,1155.51 3653.23,1155.51 3649.09,1159.65
NetC47_1: C47.1 R7.1 | length 60.8
  Top Layer w10: R7.1@3484.92,1139.84 3484.92,1184.17 3485.28,1184.53 C47.1@3485.28,1200.51
NetC48_1: C48.1 D3.1 U13.16 | length 593
  Top Layer w10: C48.1@3317.09,1230.51 3344.96,1230.51 3387.38,1188.09 3387.38,972.93 3378.64,964.19 3350.3,964.19 U13.16@3348.82,962.72
  Top Layer w15: D3.1@3119.96,918.51 3213.51,918.51 3257.72,962.72 U13.16@3348.82,962.72
NetC49_2: C49.2 L13.1 | length 47.1
  Top Layer w10: C49.2@330.19,1716.69 330.19,1751.9 330.27,1751.98 L13.1@330.27,1763.79
NetC50_2: C50.2 L14.1 | length 47.5
  Top Layer w10: L14.1@809.07,1760.57 809.07,1724.92 809.12,1724.86 C50.2@809.12,1713.05
NetD1C_1: D1C.1 R5C.2 | length 78.2
  Top Layer w7.87: D1C.1@3006.22,2829.93 3032.78,2829.93 3053.52,2850.67 R5C.2@3075.79,2850.67
NetD1C_2: D1C.2 R7C.2 | length 73.7
  Top Layer w7.87: D1C.2@3006.22,2794.49 3042.32,2794.49 3050.75,2786.07 3074.18,2786.07 R7C.2@3075.79,2787.68
NetD1C_3: D1C.3 R8C.2 | length 163.8
  Top Layer w8: D1C.3@2943.23,2794.49 2966.92,2794.49 3002.41,2759 3045.41,2759 3075.79,2728.62 R8C.2@3075.79,2724.68
NetQ1_1: Q1.1 U13.19 | length 590
  Top Layer w15: Q1.1@2814.96,750.51 2844.96,780.51 3107.05,780.51 3212.49,885.94 U13.19@3348.82,885.94
NetQ2_1: Q2.1 U13.15 | length 862.5
  Top Layer w10: Q2.1@2829.96,1485.51 2829.96,1385.51 2992.22,1223.26 2992.22,1088.26 3089.59,990.89 3318.68,990.89 3321.26,988.31 U13.15@3348.82,988.31
NetQ2_2: Q2.2 R12.2 U13.12 | length 1262.3
  Top Layer w10: Q2.2@2629.96,1485.51 2634.82,1480.65 2680.1,1480.65 2770.96,1571.51 2898.96,1571.51 3014.96,1455.51 3014.96,1110.51 3089.96,1035.51 R12.2@3140.78,1035.51 3140.78,1086.33 3164.96,1110.51 3269.96,1110.51 3315.39,1065.08 U13.12@3348.82,1065.08
NetR2C_1: R2C.1 SW1C.2 | length 172.3
  Top Layer w7.87: R2C.1@2291.34,2501.26 2289.37,2499.29 2289.37,2386.1 2320.87,2354.61 SW1C.2@2332.68,2354.61
NetR3_2: R3.2 U1.2 U1.6 | length 323.6
  Top Layer w15: U1.2@412,2577.72 412,2660 462,2710 U1.6@462,2792.28 463.5,2793.78 R3.2@463.5,2880
NetR3C_1: R3C.1 SW1C.5 | length 172.3
  Top Layer w7.87: SW1C.5@2187.01,2354.61 2198.82,2354.61 2230.32,2386.1 2230.32,2499.29 R3C.1@2228.35,2501.26
NetR4_2: R4.2 U2.2 U2.6 | length 323.6
  Top Layer w15: U2.2@757,2577.72 757,2660 807,2710 U2.6@807,2792.28 808.5,2793.78 R4.2@808.5,2880
NetR5_2: R5.2 R8.2 U13.2 | length 563.7
  Top Layer w15: U13.2@3581.1,885.94 3629.53,885.94 3643.91,871.56 3643.91,852.14 3648.22,847.83 R5.2@3649.56,847.83 3705.03,847.83 v5(3705.31,848.11) ; v5(3719.96,1185.51) 3743.09,1162.39 R8.2@3743.09,1126.36
  Bottom Layer w15: v5(3705.31,848.11) 3705.31,1170.22 3719.96,1184.87 v5(3719.96,1185.51)
NetR6_2: R6.2 U13.4 | length 174.3
  Top Layer w10: R6.2@3544.17,795.59 3544.17,810.35 3542.54,811.97 3542.54,926.13 3553.54,937.13 U13.4@3581.1,937.13
NetR6C_1: R6C.1 U2C.8 | length 78.7
  Top Layer w7.87: R6C.1@2349.41,2043.39 U2C.8@2428.15,2043.39
NetR6R_1: R6R.1 SW1R.A2 | length 91.3
  Top Layer w7.87: R6R.1@2377.95,2641.02 2377.95,2715.83 2386.81,2724.68 SW1R.A2@2390.75,2724.68
NetR7R_1: R7R.1 SW2R.A1 | length 151.6
  Top Layer w7.87: SW2R.A1@2790.35,2724.68 R7R.1@2941.93,2724.68
NetR9_1: R9.1 R13.3 U3.2 | length 303.7
  Top Layer w15: U3.2@1630,3034.28 1630,3072 1650,3092 1755,3092 1767.3,3079.7 1767.3,3050.22 R9.1@1774.03,3043.49 1774.03,2993.09 1775.63,2991.49 R13.3@1775.63,2967.87
NetR10_1: R10.1 R14.3 U4.2 | length 293.9
  Top Layer w15: U4.2@1213.69,3034.28 1213.69,3074.28 1233.69,3094.28 1323.69,3094.28 1338.69,3079.28 1338.69,3048.29 R10.1@1344.35,3042.63 1344.35,2990.89 ; R14.3@1344.32,2967.24 R14.3@1344.32,2990.86
NetR11_2: R11.2 U13.3 | length 265.8
  Top Layer w15: U13.3@3581.1,911.54 3760.98,911.54 3800.61,951.16 R11.2@3800.61,980.99
NetR15_3: R15.3 R29.1 U9.6 | length 163.3
  Top Layer w8: R15.3@1751.65,2126.54 1775.27,2126.54 1775.32,2126.5 R29.1@1838.2,2126.5 1839.01,2125.69 1839.01,2099.19 1848.51,2089.69 U9.6@1848.51,2054.06
NetR16_3: R16.3 R30.1 U10.6 | length 165.5
  Top Layer w8: R16.3@1287.24,2126.37 1310.86,2126.37 1310.99,2126.5 R30.1@1373.2,2126.5 1374.01,2125.69 1374.01,2099.19 1390.31,2082.88 U10.6@1390.31,2054.06
NetR19_2: R19.2 U9.8 | length 89.8
  Top Layer w8: R19.2@1733.2,1961.5 1736.51,1964.81 1763.01,1964.81 1792.85,1994.65 1808.79,1994.65 U9.8@1809.14,1995
NetR20_2: R20.2 U10.8 | length 89.8
  Top Layer w8: R20.2@1275,1961.5 1285.12,1971.62 1304.81,1971.62 1328.2,1995 U10.8@1350.94,1995
NetR25_1: R25.1 R27.3 U5.2 | length 262.8
  Top Layer w15: R27.3@279.37,1234.13 279.37,1177.05 279.54,1176.87 R25.1@279.54,1154.37 374.37,1154.37 410,1190 U5.2@410,1227.72
NetR26_1: R26.1 R28.3 U6.2 | length 261.5
  Top Layer w15: R26.1@758.83,1155.32 855.32,1155.32 890,1190 U6.2@890,1227.72 ; R26.1@759.37,1155.86 R28.3@759.37,1234.13
NetR33_1: R33.1 U13.11 | length 64.5
  Top Layer w15: U13.11@3348.46,1091.03 R33.1@3348.46,1155.51
NetTP_ADC_TP: TP_ADC.TP U1R.40 | length 252
  Top Layer w7.87: U1R.40@3393.7,2416.12 3393.7,2201.3 TP_ADC.TP@3420,2175
NetU1R_2: U1R.2
NetU1R_3: U1R.3
NetU1R_4: U1R.4
NetU1R_5: U1R.5
NetU1R_6: U1R.6
NetU1R_7: U1R.7
NetU1R_8: U1R.8
NetU1R_9: U1R.9
NetU1R_11: U1R.11
NetU1R_12: U1R.12
NetU1R_13: U1R.13
NetU1R_14: U1R.14
NetU1R_15: U1R.15
NetU1R_41: U1R.41
"Point Filter L": C25.1 R1.2 TP3.TP | length 290.3
  Top Layer w15: C25.1@538.22,2152.4 538.22,2217.78 530.5,2225.5 R1.2@530.5,2340 TP3.TP@630,2340
"Point Filter R": C26.1 R2.2 TP6.TP | length 326.4
  Top Layer w15: C26.1@872.59,2154.13 872.59,2337.09 R2.2@875.5,2340 930,2340 TP6.TP@990,2400
"Post Filter Amp L": C3.1 L3.1 R3.1 TP1.TP U3.3 | length 1518.1
  Top Layer w15: R3.1@530.5,2880 530.5,2953.5 L3.1@532,2955 C3.1@532,3030 ; TP1.TP@630,3030 C3.1@532,3030 ; U3.3@1580,3034.28 1580,3100 1485,3195 615,3195 532,3112 C3.1@532,3030
"Post Filter Amp R": C4.1 L4.1 R4.1 TP4.TP U4.3 | length 708.5
  Top Layer w15: R4.1@875.5,2880 875.5,2953.5 L4.1@877,2955 C4.1@877,3030 ; TP4.TP@975,3030 C4.1@877,3030 ; U4.3@1163.69,3034.28 1163.69,3096.31 1110,3150 930,3150 877,3097 C4.1@877,3030
QSPI_SCLK_RP2040: U1R.52 U2R.6 | length 283
  Top Layer w7.87: U1R.52@3458.17,2590.83 3520.87,2590.83 3555.12,2556.57 3555.12,2520.04 3590.63,2484.53 3620.67,2484.53 3644.29,2508.15 U2R.6@3644.29,2529.8
QSPI_SD0_RP2040: U1R.53 U2R.5 | length 178.4
  Top Layer w7.87: U1R.53@3458.17,2606.57 3535.43,2606.57 3594.29,2547.72 U2R.5@3594.29,2533.8 U2R.5@3594.29,2529.8
QSPI_SD1_RP2040: U1R.55 U2R.2 | length 435.6
  Top Layer w7.87: U1R.55@3458.17,2638.07 3492.13,2638.07 3559.06,2705 3559.06,2833.15 3584.51,2858.6 3654.08,2858.6 3654.13,2858.54 3666.73,2858.54 3694.29,2830.98 U2R.2@3694.29,2813.32 U2R.2@3694.29,2809.33
QSPI_SD2_RP2040: U1R.54 U2R.3 | length 309.4
  Top Layer w7.87: U1R.54@3458.17,2622.32 3535.43,2622.32 3644.29,2731.18 U2R.3@3644.29,2809.33
QSPI_SD3_RP2040: U1R.51 U2R.7 | length 334.1
  Top Layer w7.87: U1R.51@3458.17,2575.08 3507.65,2575.08 3535.43,2547.29 3535.43,2519.96 3586.61,2468.78 3654.92,2468.78 3694.29,2508.15 U2R.7@3694.29,2529.8
QSPI_SS_RP2040: R5R.2 R7R.2 U1R.56 U2R.1 | length 1162
  Top Layer w7.87: R7R.2@2979.33,2724.68 v3(3027.56,2724.69) ; U1R.56@3458.17,2653.82 3479.07,2653.82 3527.56,2702.3 3527.56,2834.92 v3(3574.8,2882.17) 3693.11,2882.17 3744.29,2830.98 U2R.1@3744.29,2813.32 U2R.1@3744.29,2809.33
  Bottom Layer w7.87: v3(3027.56,2724.69) 3274.55,2724.69 3432.03,2882.17 v3(3574.8,2882.17)
"RP2040 L": R17.1 TP10.TP U1R.35 U9.12 | length 2029.2
  Top Layer w8: U9.12@1887.88,1935.94 1887.88,1915.31 1901.7,1901.5 R17.1@1901.7,1860 1901.7,1818.3 1950,1770 2100,1770 2175,1845 ; TP10.TP@2130,1890 2175,1845 ; U1R.35@3314.96,2416.12 3314.96,2174.96 3060,1920 2250,1920 2175,1845
"RP2040 R": R18.1 TP12.TP U1R.36 U10.12 | length 2464.7
  Top Layer w8: U10.12@1429.68,1935.94 1429.68,1915.31 1440.19,1904.81 1440.19,1878.31 R18.1@1443.5,1875 1443.5,1826.5 1530,1740 2100,1740 2258.67,1898.67 3063.16,1898.67 3330.71,2166.22 U1R.36@3330.71,2416.12
RUN_RP2040: J1R.4 R4R.2 R6R.2 U1R.26 | length 1275.3
  Top Layer w7.87: R6R.2@2377.95,2603.62 2377.95,2557.73 2457.64,2478.04 ; v3(2465.89,2338.86) 2464.57,2338.86 2422.24,2381.19 2422.24,2442.63 2457.64,2478.04 ; J1R.4@2557.68,2517.6 2518.11,2478.04 2457.64,2478.04 ; R4R.2@2637.8,2291.61 v3(2637.8,2338.86) 2743.34,2338.86 2853.57,2449.09 3008.49,2449.09 3039.99,2480.59 U1R.26@3187.5,2480.59
  Bottom Layer w7.87: v3(2465.89,2338.86) v3(2637.8,2338.86)
SCK_RP2CAN: U1C.10 U1R.29 | length 400.1
  Top Layer w7.87: U1C.10@2900.59,2255 2920.84,2255 2998.21,2332.37 2998.21,2342.14 3050.44,2394.37 3212.01,2394.37 3220.47,2402.83 U1R.29@3220.47,2416.12
SCLK: U1R.38 U14.7 | length 2456.6
  Top Layer w7.87: U14.7@1414.68,1585.71 1415.67,1586.69 1415.67,1603.34 1507.33,1695 2104.09,1695 2275.77,1866.68 3078.05,1866.68 3362.2,2150.83 U1R.38@3362.2,2416.12
SDATA: U1R.39 U14.6 | length 2454.4
  Top Layer w7.87: U14.6@1434.37,1585.71 1435.35,1586.69 1435.35,1600.35 1515,1680 2108.71,1680 2279.74,1851.03 3084.08,1851.03 3377.95,2144.9 U1R.39@3377.95,2416.12
SWCLK_RP2040: J1R.3 U1R.24 | length 606.9
  Top Layer w7.87: J1R.3@2607.68,2517.6 2643.11,2482.16 2997.01,2482.16 3026.94,2512.09 U1R.24@3187.5,2512.09
SWDIO_RP2040: J1R.1 U1R.25 | length 718.6
  Top Layer w7.87: J1R.1@2607.68,2467.6 2607.68,2437.06 2622.24,2422.49 2622.24,2392.56 2657.64,2357.16 2738.89,2357.16 2848.14,2466.41 3003.54,2466.41 3033.46,2496.34 U1R.25@3187.5,2496.34
TERM_DET_RP2CAN: R1C.2 SW1C.3 U1C.9 | length 621.6
  Top Layer w7.87: SW1C.3@2332.68,2423.5 2344.49,2423.5 2442.46,2325.53 v3(2442.46,2324.35) ; v3(2767.72,2307.36) 2768.9,2306.18 2821.65,2306.18 R1C.2@2822.83,2305 ; R1C.2@2818.9,2305 R1C.2@2822.83,2305 ; U1C.9@2900.59,2305 R1C.2@2822.83,2305
  Bottom Layer w7.87: v3(2442.46,2324.35) 2444.75,2324.35 2461.74,2307.36 v3(2767.72,2307.36)
USB_N: J6.2 R3R.1 | length 282.6
  Top Layer w7.87: R3R.1@3548.32,2266.38 3552.1,2262.6 3568.77,2262.6 3573.38,2257.99 3573.38,2242.58 3646.7,2169.27 3745.54,2169.27 3746.47,2168.35 3775.75,2168.35 J6.2@3779.69,2164.41
USB_P: J6.3 R2R.1 | length 256.3
  Top Layer w7.87: R2R.1@3614.33,2266.38 3610.54,2262.6 3593.87,2262.6 3589.26,2257.99 3589.26,2249.16 3653.27,2185.14 3745.54,2185.14 3746.47,2186.06 3775.75,2186.06 J6.3@3779.69,2190
USB_RP2040_N: R3R.2 U1R.46 | length 263.6
  Top Layer w7.87: U1R.46@3458.17,2496.34 3515.75,2496.34 3525.15,2486.93 3537.84,2474.25 3541.9,2470.19 3541.9,2398.74
  Top Layer w8: 3541.9,2398.74 3541.9,2358.11 3548.32,2351.69 R3R.2@3548.32,2303.78
USB_RP2040_P: R2R.2 U1R.47 | length 310.5
  Top Layer w7.87: U1R.47@3458.17,2512.09 3522.27,2512.09 3531.68,2502.68 3557.83,2476.52 3557.83,2387.42 3557.9,2387.36
  Top Layer w8: 3557.9,2387.36 3557.9,2387.11 3614.33,2330.68 R2R.2@3614.33,2303.78
XIN_RP2040: C1R.1 U1R.20 Y1R.1 | length 443.1
  Top Layer w7.87: C1R.1@2842.52,2655.2 2843.8,2653.92 2866.14,2653.92 2889.86,2630.2 Y1R.1@2929.13,2630.2 2929.13,2636.1 2962.6,2669.57 3025.68,2669.57 3039.37,2655.88 3039.37,2606.57 3070.87,2575.08 U1R.20@3187.5,2575.08
XOUT_RP2040: R1R.1 U1R.21 | length 82.1
  Top Layer w7.87: R1R.1@3114.25,2543.58 3114.25,2547.52 3126.06,2559.33 U1R.21@3187.5,2559.33
pads on no net: J1. J1R.A J1R.B J1R.C J1R.D J1R.E J1R.F J1R.G J2. J3. J4. J6.4 R13.1 R14.1 R15.1 R16.1 R21.1 R22.1 R27.1 R28.1 SW1R.A1 SW2R.A2 U1.1 U1.5 U1.8 U1C.3 U1C.5 U1C.8 U2.1 U2.5 U2.8 U3.1 U3.5 U3.8 U4.1 U4.5 U4.8 U5.1 U5.5 U5.8 U6.1 U6.5 U6.8 Y1.1

## Polygon pours and split planes (outlines as drawn)
GND on Top Layer "GND_L01_P071" (solid, pour order 71): 2370,3915 2340,3885 2340,3765 2385,3720 2610,3720 2655,3765 2655,3870 2610,3915 2580,3915
-15V on Top Layer "-15V_L01_P025" (solid, pour order 25): 3209.81,1650.19 2985,1875 2280,1875 1680,1275 1215,1275 1155,1215 1155,1035 1215,990 1980,990 2580,1590 2910,1590 3030,1470 3135,1470 3208.5,1543.5 3208.5,1551
GND on Top Layer "GND_L01_P070" (solid, pour order 70): 3615,2115 3570,2070 3270,2070 3120,1920 3120,1770 3195,1695 3840,1695 3930,1785 3930,2070 3885,2115
3V3 on Top Layer "3V3_L01_P069" (solid, pour order 69): 2040,2775 1995,2820 1995,3240 2040,3285 2085,3285 2235,3135 2670,3135 2700,3105 2700,3060 2580,2940 2370,2940 2250,2820 2145,2820 2100,2775
15V on Top Layer "15V_L01_P067" (solid, pour order 67): 1470,2970 1631.31,2970 1659.5,2941.81 1659.5,2788.2 1652.27,2780.97 1610.34,2780.97 1601.31,2790 1601.31,2850 1586.31,2865 1467.23,2865 1455,2877.23 1455,2955
15V on Top Layer "15V_L01_P066" (solid, pour order 66): 1050,2970 1215,2970 1243.2,2941.8 1243.2,2788.2 1235.97,2780.97 1194.03,2780.97 1185,2790 1185,2850 1170,2865 1050,2865 1035,2880 1035,2955
3V3 on Top Layer "3V3_L01_P062" (solid, pour order 62): 1200,1710 1200,1695 1185,1680 1185,1635 1230,1590 1293.64,1590 1320,1563.64 1320,1524.23 1299.96,1504.19 1150.81,1504.19 1125,1530 1125,1710 1140,1725 1185,1725
3V3 on Top Layer "3V3_L01_P061" (solid, pour order 61): 1328.36,1448.36 1371.64,1448.36 1395,1425 1395,1320 1380,1305 1335,1305 1320,1320 1320,1440
3V3 on Top Layer "3V3_L01_P060" (solid, pour order 60): 1350,3555 1350,3315 1425,3240 1830,3240 1920,3150 1920,2610 1800,2490 1800,2430 1890,2340 2040,2340 2100,2400 2100,3270 1950,3420 1575,3420 1425,3570 1365,3570
3V3 on Top Layer "3V3_L01_P058" (solid, pour order 58): 2040,1935 2100,1995 2100,2415 2025,2490 1800,2490 1770,2460 1770,2400 1905,2265 1905,2220 1980,2145 2010,2145 2040,2115 2040,2086.05 2010,2056.05 2010,1950 2025,1935
3V3 on Top Layer "3V3_L01_P057" (solid, pour order 57): 1975.41,2065.41 1950,2040 1950,2010 1944.56,2004.56 1914.04,2004.56 1909,1999.52 1909,1970.18 1959.61,1919.57 2024.57,1919.57 2040,1935 2040,2044.77 2019.36,2065.41
3V3 on Top Layer "3V3_L01_P056" (solid, pour order 56): 135,1995 135,2235 180,2280 360,2280 405,2235 405,2160 375,2130 255,2130 225,2100 225,1989.23 215.77,1980 150,1980
3V3 on Top Layer "3V3_L01_P055" (solid, pour order 55): 615,2010 615,2235 660,2280 795,2280 840,2235 840,2160 810,2130 735,2130 705,2100 705,2010 690,1995 630,1995
3V3 on Top Layer "3V3_L01_P043" (solid, pour order 43): 705,1955.81 705,1710 795,1620 900,1620 915,1605 915,1545 900,1530 690,1530 615,1605 615,1920 615,2010 645,2040 735,2040 735,1992.16
3V3 on Top Layer "3V3_L01_P052" (solid, pour order 52): 1560,2175 1575,2160 1575,1956.23 1590,1941.23 1635,1986.23 1635,2160 1650,2175 1650,2205 1635,2220 1575,2220 1560,2205
3V3 on Top Layer "3V3_L01_P051" (solid, pour order 51): 1755,2175 1785,2205 1785,2325 1740,2370 1515,2370 1455,2310 1455,2235 1515,2175
3V3 on Top Layer "3V3_L01_P050" (solid, pour order 50): 1530,2070 1500,2040 1500,2017.36 1487.05,2004.4 1455.02,2004.4 1449.69,1999.07 1449.69,1970.82 1504.62,1915.89 1564.66,1915.89 1590,1941.23 1590,2055 1575,2070
3V3 on Top Layer "3V3_L01_P049" (solid, pour order 49): 1260,1695 1305,1740 1305,1830 1170,1965 1170,2160 1185,2175 1290,2175 1320,2205 1320,2325 1290,2355 975,2355 900,2280 900,2220 1065,2055 1065,1755 1125,1695
15V on Top Layer "15V_L01_P048" (solid, pour order 48): 2488.18,613.73 2565,536.91 2565,135.55 2474.45,45 1920,45 1800,165 1800,495 1920,615
-15V on Top Layer "-15V_L01_P045" (solid, pour order 45): 1093,1275 1020,1202 1020,1170 1155,1035 1215,1035 1275,1095 1275,1245 1245,1275
-15V on Top Layer "-15V_L01_P040" (solid, pour order 40): 1003,1275 973,1245 973,1200 1003,1170 1110,1170 1110,1258 1093,1275
3V3 on Top Layer "3V3_L01_P044" (solid, pour order 44): 255,1989.23 225,1959.23 225,1709.35 315.4,1618.95 420.4,1618.95 435.4,1603.95 435.4,1543.95 420.4,1528.95 210.4,1528.95 135.4,1603.95 135.4,1948.95 135.4,1995.4 171.73,2031.73 237.44,2031.73 255,2014.16
-15V on Top Layer "-15V_L01_P041" (solid, pour order 41): 523,1275 493,1245 493,1200 523,1170 613,1170 630,1187 630,1258 613,1275
15V on Top Layer "15V_L01_P039" (solid, pour order 39): 870,1470 885,1485 900,1485 915,1470 915,1410 930,1395 990,1395 1005,1380 1005,1305 990,1290 885,1290 870,1305 870,1335
15V on Top Layer "15V_L01_P038" (solid, pour order 38): 390,1470 405,1485 420,1485 435,1470 435,1410 450,1395 510,1395 525,1380 525,1305 510,1290 405,1290 390,1305 390,1335
15V on Top Layer "15V_L01_P037" (solid, pour order 37): 780,2820 765,2835 750,2835 735,2820 735,2760 720,2745 675,2745 660,2730 660,2670 675,2655 735,2655 780,2700
15V on Top Layer "15V_L01_P036" (solid, pour order 36): 435,2820 420,2835 405,2835 390,2820 390,2760 375,2745 330,2745 315,2730 315,2670 330,2655 390,2655 435,2700
-15V on Top Layer "-15V_L01_P034" (solid, pour order 34): 870,2625 840,2595 840,2550 870,2520 960,2520 990,2550 990,2595 960,2625
-15V on Top Layer "-15V_L01_P033" (solid, pour order 33): 525,2625 495,2595 495,2550 525,2520 615,2520 645,2550 645,2595 615,2625
-15V on Top Layer "-15V_L01_P032" (solid, pour order 32): 1068.69,3135 1098.69,3135 1128.69,3105 1128.69,3015 1113.69,3000 1083.69,3000 1050,3033.69 1050,3116.31
-15V on Top Layer "-15V_L01_P031" (solid, pour order 31): 1485,3135 1515,3135 1545,3105 1545,3015 1530,3000 1500,3000 1470,3030 1470,3120
GND on Top Layer "GND_L01_P030" (solid, pour order 30): 1155,3810 1215,3810 1335,3690 1335,3540 1320,3525 1155,3525 1125,3555 1125,3780
-15V on Top Layer "-15V_L01_P000" (solid, pour order 0): 3553.54,975.51 3760.68,975.51 3782.9,997.73 3832.18,997.73 3839.96,1005.51 3839.96,1065.51 3803.47,1102 3662.86,1102 3659.96,1099.1 3659.96,1005.51 3554.96,1005.51 3553.54,1004.09
-15V on Top Layer "-15V_L01_P001" (solid, pour order 1): 3378.34,1000.21 3179.31,1000.21 3164.91,1014.6 3164.91,1070.6 3188.91,1094.6 3266.35,1094.6 3308.9,1052.04 3378.98,1052.04
-15V on Top Layer "-15V_L01_P003" (solid, pour order 3): 3314.96,1125.51 3059.96,1125.51 3029.96,1155.51 3029.96,1595.01 3100.46,1665.51 3839.96,1665.51 3899.96,1605.51 3899.96,1395.51 3824.96,1320.51 3449.96,1320.51 3404.96,1275.51 3329.96,1275.51 3299.96,1245.51 3299.96,1215.51 3314.96,1200.51
-15V on Top Layer "-15V_L01_P004" (solid, pour order 4): 3783.79,997.73 3862.18,997.73 3899.96,1035.51 3899.96,1395.51 3884.96,1410.51 3569.96,1410.51 3524.96,1365.51 3524.96,1320.51 3569.96,1320.51 3674.96,1215.51 3734.96,1215.51 3783.79,1166.69 3783.79,1114.34 3762.18,1092.73
3V3 on Top Layer "3V3_L01_P007" (solid, pour order 7): 699.58,1985.26 715.87,1968.98 847.1,1968.98 860.34,1955.74 859.61,1955 859.61,1918.83 877.32,1918.83 877.81,1919.32 877.81,2055.38 890.6,2068.17 917.91,2068.17 924.8,2075.06 924.8,2110.98 914.96,2120.82 877.81,2120.82 836.72,2079.74 836.72,2048 828.73,2040 724.32,2040 699.58,2015.26
3V3 on Top Layer "3V3_L01_P008" (solid, pour order 8): 219.98,1984.21 236.27,1967.93 367.5,1967.93 380.74,1954.69 380,1953.95 380,1917.78 397.72,1917.78 399.44,1919.51 399.44,2055.56 411,2067.12 438.31,2067.12 448.06,2076.87 448.06,2109.76 438.04,2119.78 398.21,2119.78 357.12,2078.69 357.12,2046.95 341.87,2031.7 237.47,2031.7 219.98,2014.21
3V3 on Top Layer "3V3_L01_P011" (solid, pour order 11): 1200,3930 1155,3885 1155,3840 1170,3825 1215,3825 1350,3690 1350,3555 1365,3540 1425,3540 1440,3555 1440,3690 1515,3765 1515,3885 1470,3930
GND on Top Layer "GND_L01_P012" (solid, pour order 12): 1680,3570 1830,3720 2085,3720 2130,3675 2130,3570 2010,3450 1575,3450 1530,3495 1530,3540 1560,3570
15V on Top Layer "15V_L01_P013" (solid, pour order 13): 2250,3660 2295,3705 2550,3705 2595.28,3659.72 2594.76,3434.76 2535,3375 2310,3375 2250,3435
5V on Top Layer "5V_L01_P010" (solid, pour order 10): 1830,3960 1830,3735 1680,3585 1560,3585 1515,3540 1485,3540 1455,3570 1455,3660 1500,3705 1560,3705 1605,3750 1605,3870 1695,3960 1710,3960
5V on Top Layer "5V_L01_P009" (solid, pour order 9): 1800,3960 2235,3960 2295,3900 2295,3735 2235,3675 2235,3570 2220,3555 2160,3555 2145,3570 2145,3675 2085,3735 1800,3735 1755,3780 1755,3915
15V on Top Layer "15V_L01_P005" (solid, pour order 5): 2474.96,45.51 2399.96,120.51 2399.96,525.51 2488.18,613.73 3253.18,613.73 3344.96,705.51 3551.52,705.51 3562.84,716.83 3562.84,836.72 3549.12,850.44 3549.12,869.84 3552.13,872.86 3607.35,872.86 3622.74,857.46 3622.74,831.34 3631.75,822.33 3657.88,822.33 3677.96,802.25 3677.96,652 3678.29,651.66 3678.05,453.05 3585,360 3585,105.51 3525,45.51
GND on Middle 1 Layer "GND_L02_P006" (solid, pour order 6): -60,4125 4095,4125 4095,-75 -60,-75
GND on Middle 2 Layer "GND_L03_P014" (solid, pour order 14): -60,4125 4095,4125 4095,-75 -60,-75
3V3 on Bottom Layer "3V3_L04_P068" (solid, pour order 68): 2310,3135 2190,3015 2190,2880 2250,2820 2670,2820 2730,2880 2730,3075 2670,3135
3V3 on Bottom Layer "3V3_L04_P065" (solid, pour order 65): 2655,3135 2340,2820 2340,2085 2385,2040 3450,2040 3870,2460 3870,2850 3585,3135 3570,3135
-15V on Bottom Layer "-15V_L04_P019" (solid, pour order 19): 1530,2985 1590,3045 1590,3210 1530,3270 1080,3270 1050,3240 1050,3030 1095,2985
3V3 on Bottom Layer "3V3_L04_P059" (solid, pour order 59): 1875,2490 1935,2430 1935,2235 1875,2175 1725,2175 1665,2235 1665,2385 1770,2490
3V3 on Bottom Layer "3V3_L04_P054" (solid, pour order 54): 990,2370 1740,2370 1785,2325 1785,2205 1755,2175 1230,2175 1185,2130 915,2130 870,2175 870,2250
3V3 on Bottom Layer "3V3_L04_P053" (solid, pour order 53): 255,2280 210,2235 210,2160 240,2130 1020,2130 1035,2145 1035,2235 990,2280
15V on Bottom Layer "15V_L04_P046" (solid, pour order 46): 1665,1290 1800,1155 1800,165 1920,45 2250,45 2370,165 2370,1605 2175,1800 1935,1800 1665,1530 1665,1440
15V on Bottom Layer "15V_L04_P029" (solid, pour order 29): 1665,1290 2175,1800 2175,2730 2130,2775 2025,2775 1950,2700 1950,1875 1695,1620 1020,1620 945,1545 945,1365 1020,1290 1050,1290
-15V on Bottom Layer "-15V_L04_P028" (solid, pour order 28): 345,2625 975,2625 1020,2580 1020,2475 975,2430 255,2430 195,2370 135,2370 75,2430 75,2715 135,2775 180,2775 334.77,2620.23
-15V on Bottom Layer "-15V_L04_P021" (solid, pour order 21): 1050,1275 1110,1215 1110,1065 1035,990 105,990 15,1080 15,1200 90,1275
-15V on Bottom Layer "-15V_L04_P026" (solid, pour order 26): 1365,990 1425,1050 1425,1215 1365,1275 1050,1275 990,1215 990,1035 1035,990
-15V on Bottom Layer "-15V_L04_P024" (solid, pour order 24): 1080,3270 1110,3240 1110,3009.72 1085.28,2985 255,2985 195,2925 195,2805 165,2775 45,2775 15,2805 15,3165 120,3270
-15V on Bottom Layer "-15V_L04_P023" (solid, pour order 23): 195,1350 270,1275 270,1245 225,1200 120,1200 75,1245 75,1335 90,1350
-15V on Bottom Layer "-15V_L04_P022" (solid, pour order 22): 15,1200 15,2805 45,2835 165,2835 195,2805 195,1215 135,1155 60,1155
15V on Bottom Layer "15V_L04_P020" (solid, pour order 20): 285,1349.57 344.57,1290 1050,1290 1110,1350 1110,1530 1020,1620 360,1620 285,1545
15V on Bottom Layer "15V_L04_P017" (solid, pour order 17): 1620,2715 1920,2715 1950,2685 2130,2685 2175,2730 2175,3030 2310,3165 2565,3165 2625,3225 2625,3360 2520,3465 2145,3465 1650,2970 1575,2895 1575,2760
15V on Bottom Layer "15V_L04_P016" (solid, pour order 16): 300,2670 330,2640 1035,2640 1110,2715 1680,2715 1725,2760 1725,2925 1680,2970 1020,2970 885,2835 330,2835 300,2805
15V on Bottom Layer "15V_L04_P015" (solid, pour order 15): 2310,3525 2580,3525 2730,3375 3315,3375 3390,3300 3390,3195 3360,3165 2340,3165 2250,3255 2250,3465

## Keep-outs
Keep-Out Layer:
  the board outline again, w10

## Silkscreen, mask and mechanical layers (free items; w line width, h text height)
Top Overlay:
  drawing of 59 lines, arcs and shapes, not listed
  text "5V" at 2180,3905 h30
  text "The Underwater" at 85,3535 h60
  text "Robotics Team" at 100,3430 h60
  text "15V" at 2555,3380 h30
  text "3V3" at 1985,3320 h30
  text "Acoustics Board" at 100,3310 h60
  text "Point L" at 530,3110 h30
  text "Point R" at 830,3110 h30
  text "RESET" at 2565.74,2887.78 h40 r180
  text "BOOT" at 2781.97,2887.78 h40 r180
  text "Point" at 1490,2735 h30
  text "Point" at 1925,2735 h30
  text "R" at 1505,2690 h30
  text "L" at 1940,2690 h30
  text "Mix R" at 995,2560 h30 r270
  text "Env" at 1070,2525 h30
  text "Env" at 1490,2525 h30
  text "Mix L" at 620,2500 h30 r270
  text "R" at 1085,2480 h30
  text "L" at 1505,2480 h30
  text "TERM / ON" at 2338.15,2243.27 h40 r180
  text "Out L" at 2195,1880 h30
  text "-15V" at 2690,1775 h30
  text "Out R" at 1940,1730 h30
  text "Local Oscillator" at 1400,1715 h30
  text "DDS Clock" at 1535,1565 h30
  text "AFE L" at 305,1535 h30
  text "AFE R" at 785,1535 h30
  text "Hydrophone R" at 65,810 h30
  text "Hydrophone L" at 1055,795 h30